# Altium PCB Стенд проверки шлейфов.PcbDoc (part 1 of 3)
Units mm, origin at the board's own origin, x right, y up, seen from the top; angles counter-clockwise.
Board outline 130 x 70 mm, 2 copper layers (Top Layer, Bottom Layer), stack 1.571 mm thick; 262 components, 230 nets, 835 pads, 564 vias.
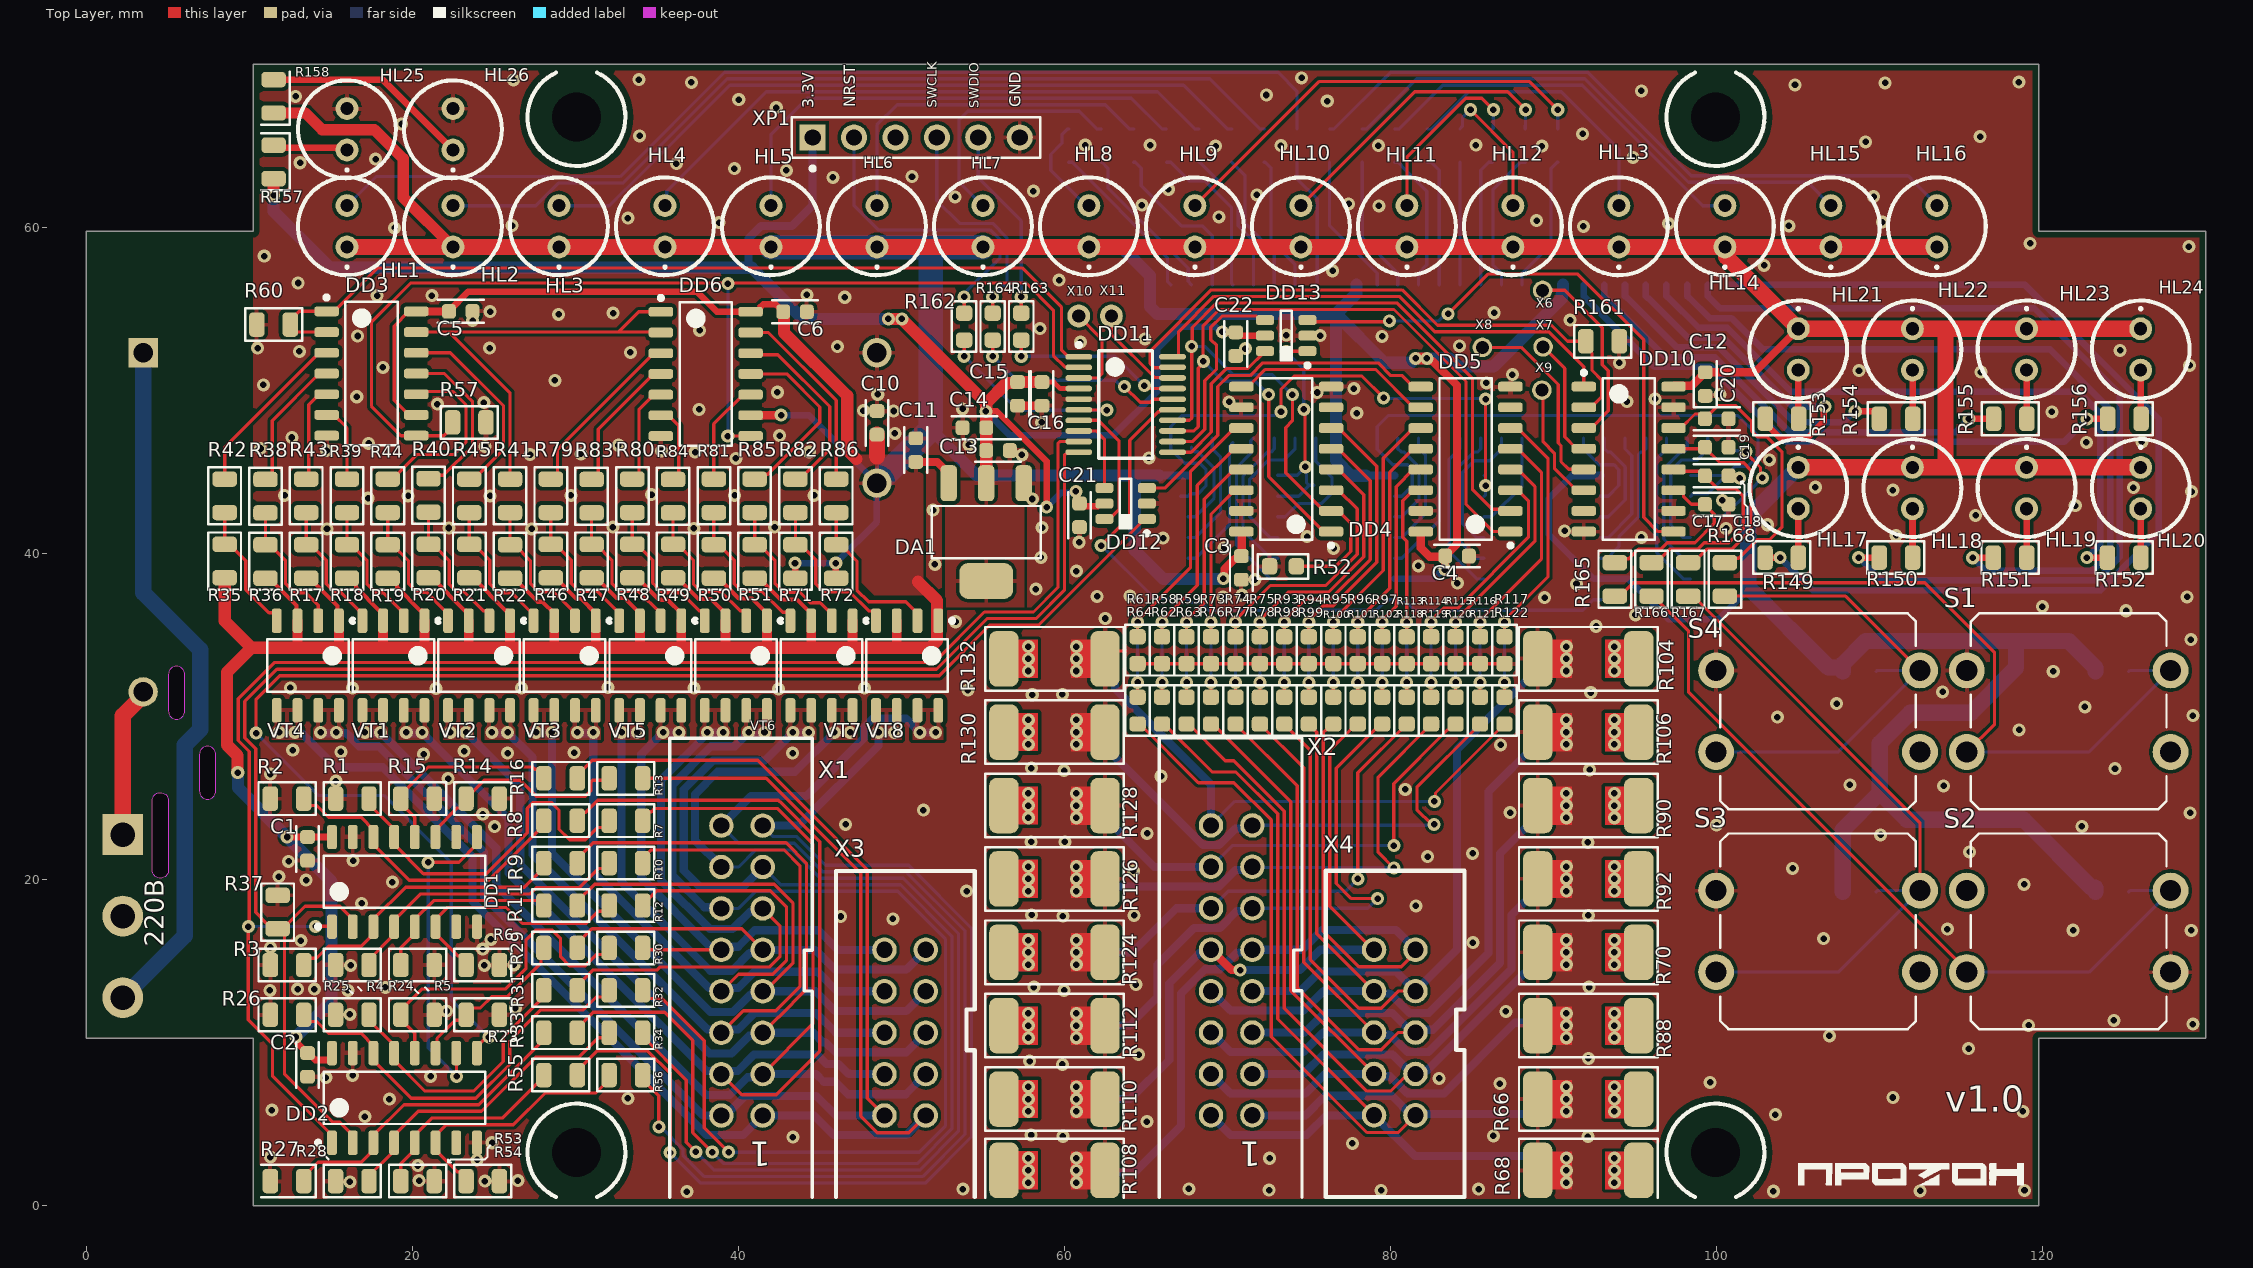
[diagram p0: Top Layer view]
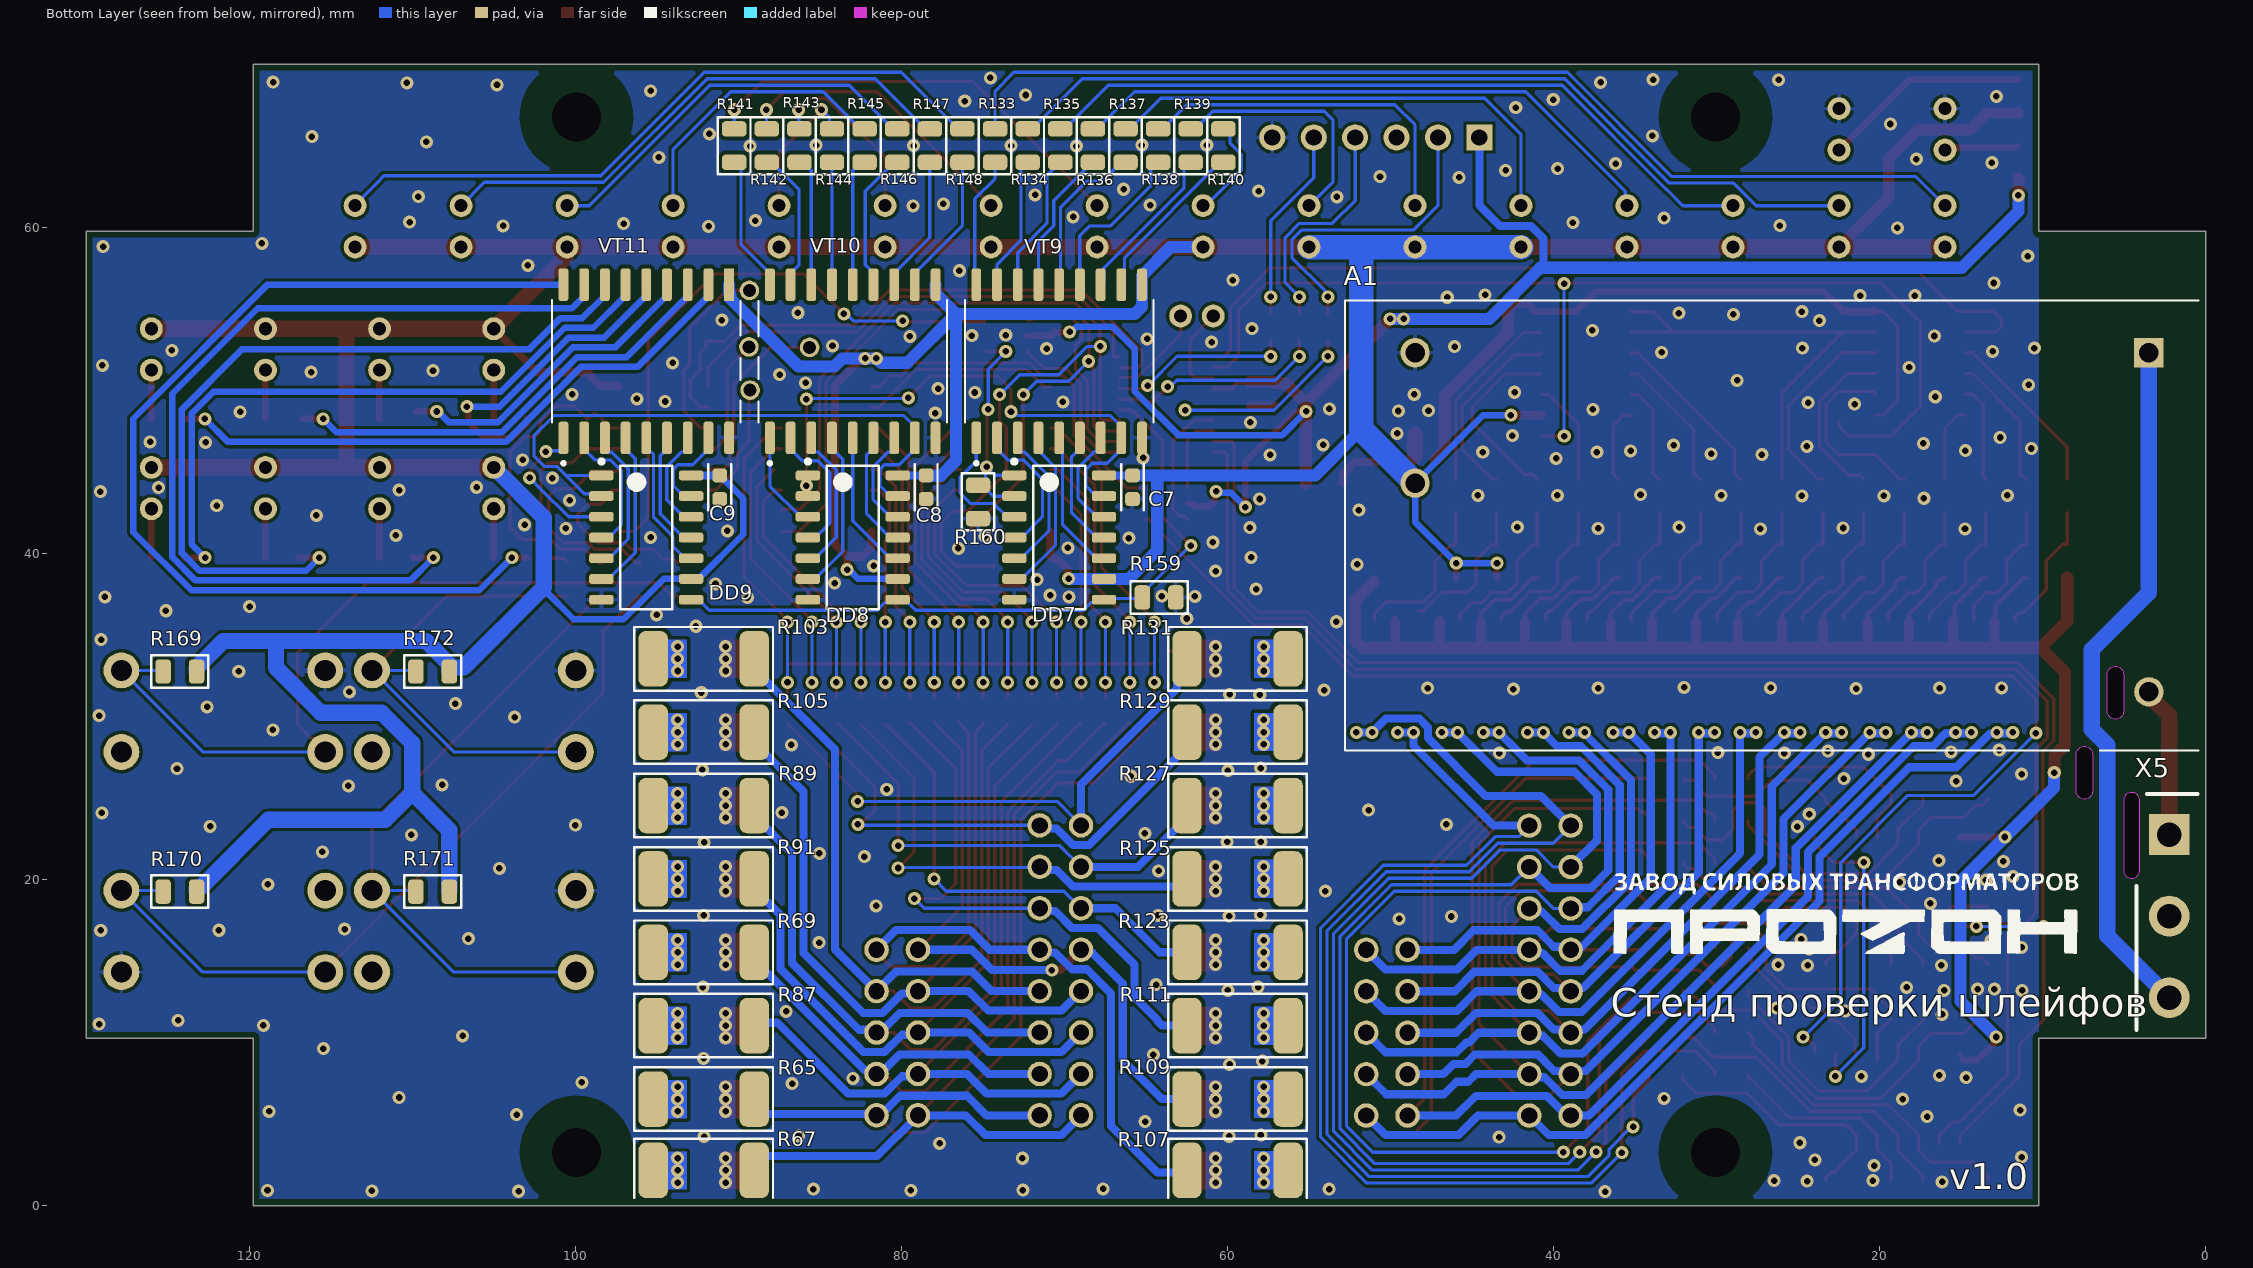
[diagram p1: Bottom Layer view, seen from below]
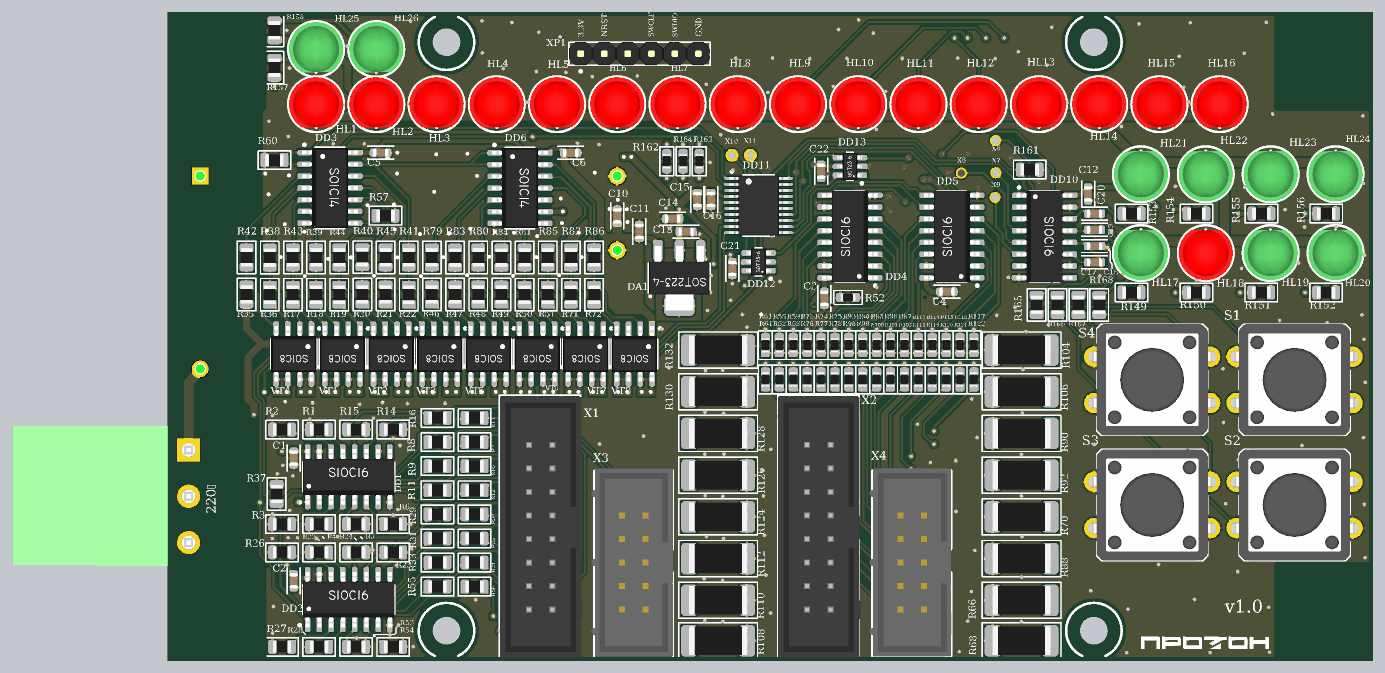
[diagram p4: 3D render of the assembled board from above, using the file's embedded part models]
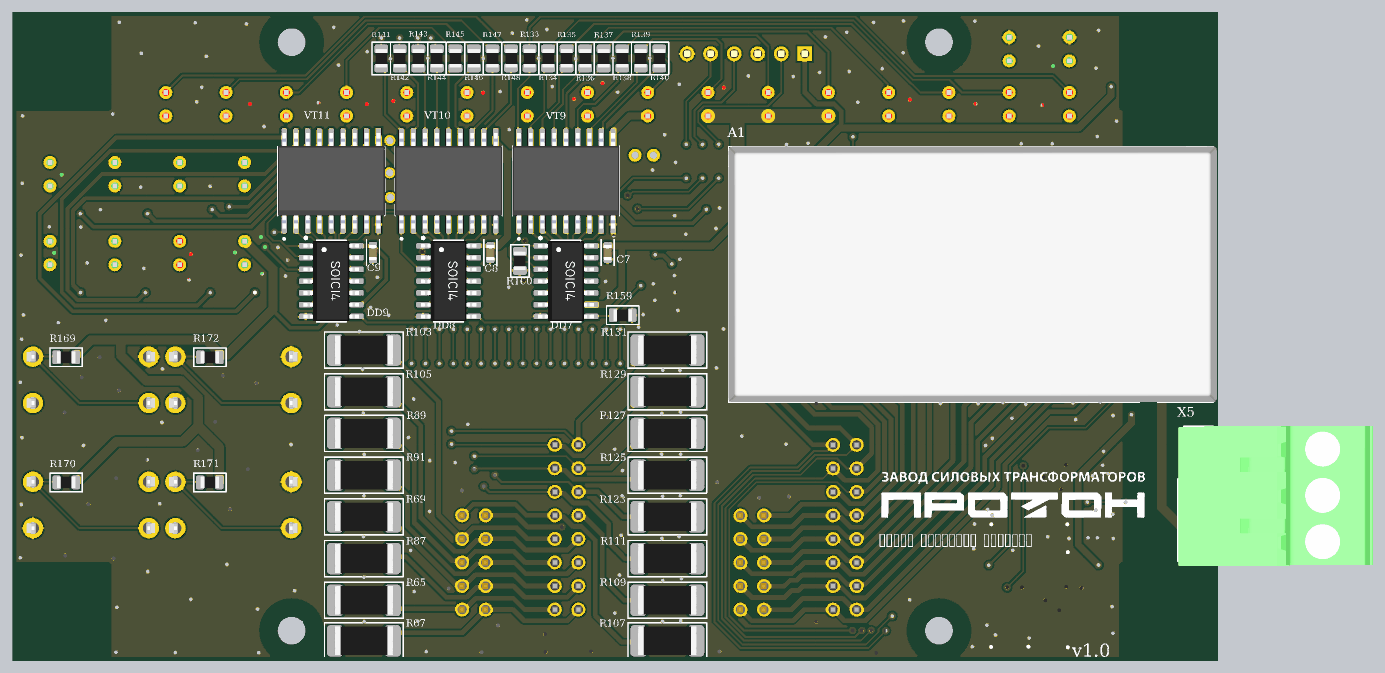
[diagram p5: 3D render of the assembled board from below, using the file's embedded part models]

## Layer stack, top to bottom
Top Solder: solder mask 0.0102, Solder Resist, Dk 3.5
Top Layer: signal copper 0.0356
Dielectric 1: dielectric 1.5, FR-4, Dk 4.8
Bottom Layer: signal copper 0.0356
Bottom Solder: solder mask 0.0102, Solder Resist, Dk 3.5

## Board outline
0,10.253 0,59.747 10.253,59.747 10.253,70 119.747,70 119.747,59.747 130,59.747 130,10.253 119.747,10.253 119.747,0 10.253,0 10.253,10.253
cut-out: 4.55,20.075 cw(c4.55,20.575) 4.05,20.575 4.05,24.825 cw(c4.55,24.825) 4.55,25.325 cw(c4.55,24.825) 5.05,24.825 5.05,20.575 cw(c4.55,20.575)
cut-out: 6.05,32.575 ccw(c5.55,32.575) 5.55,33.075 ccw(c5.55,32.575) 5.05,32.575 5.05,30.325 ccw(c5.55,30.325) 5.55,29.825 ccw(c5.55,30.325) 6.05,30.325
cut-out: 7.95,27.665 ccw(c7.45,27.665) 7.45,28.165 ccw(c7.45,27.665) 6.95,27.665 6.95,25.415 ccw(c7.45,25.415) 7.45,24.915 ccw(c7.45,25.415) 7.95,25.415

## Design rules (kind name [scope] priority, off if disabled: settings)
BoardOutlineClearance \BoardOutlineClearance [All] p1: gap=0.4 ignorepadtopadclearanceinfootprint=FALSE // Отступ элементов топологии от края печатной платы
Clearance "\Mounting holes Clearance" [IsPad and (not PadIsPlated) and (not InAnyComponent)] p1: gap=2 ignorepadtopadclearanceinfootprint=FALSE // Зазор для крепёжных отверстий платы
Clearance \UnPlatedPadClearance [IsPad and (not PadIsPlated)] p2: gap=0.25 ignorepadtopadclearanceinfootprint=FALSE // Отступ элементов топологии от неметализированного отверстия на всех полях
Clearance "\Polygon clearance" [InPolygon] p3: gap=0.2 ignorepadtopadclearanceinfootprint=FALSE // Зазор между заливкой и прочим
Clearance [IsKeepOut] p4: gap=0.001 ignorepadtopadclearanceinfootprint=FALSE
Clearance "\Clearance 4 class" [All] p5: gap=0.2 ignorepadtopadclearanceinfootprint=FALSE // Зазор 4 класс точности
Creepage "Schematic Creepage Distance_1" [InNetClass('HighVoltage2')] p1: checkdistance=2.5
Creepage "Schematic Creepage Distance" [InNetClass('HighVoltage1')] p2: checkdistance=2.5
HoleSize /UnplatedPlatedHoleSize [IsPad and (not PadIsPlated)] p1: absolutevalues=TRUE maxlimit=5 minlimit=0.025 maxpercent=80.000 minpercent=20.000 // Неметализированные контактные площадки
HoleSize /PlatedHoleSize [IsVia or (IsPad and PadIsPlated)] p2: absolutevalues=TRUE maxlimit=5 minlimit=0.3 maxpercent=80.000 minpercent=20.000 // Переходные отверстия и метализированные контактные площадки
HoleSize [All] p3: absolutevalues=TRUE maxlimit=2.54 minlimit=0.025 maxpercent=80.000 minpercent=20.000
MinimumAnnularRing \MinimumAnnularRingPad [All] p1: minimumring=0.2 // Поясок контактной площадки метализированной
MinimumAnnularRing \MinimumAnnularRingVia [IsVia] p2: minimumring=0.15 // Поясок переходного отверстия
MinimumSolderMaskSliver \MinimumSolderMaskSliver [All] p1: minsoldermaskwidth=0.15
MinimumSolderMaskSliver [All] p2: minsoldermaskwidth=0.254
PolygonConnect \PolygonConnectVia [isvia] p1: connectstyle=Direct reliefconductorwidth=0.254 reliefentries=4 polygonreliefangle="90 Angle" airgapwidth=0.254 // Подключение переходных отверстий к полигону
PolygonConnect \PolygonConnect [All] p2: connectstyle=Relief reliefconductorwidth=0.254 reliefentries=4 polygonreliefangle="90 Angle" airgapwidth=0.2
PolygonConnect [All] p3: connectstyle=Relief reliefconductorwidth=0.254 reliefentries=4 polygonreliefangle="90 Angle" airgapwidth=0.254
RoutingVias [All] p1: holewidth=0.3 width=0.8 viastyle="Through Hole" minholewidth=0.3 minwidth=0.8 maxholewidth=0.3 maxwidth=0.8
SilkToSilkClearance \SilkToSilkClearance [All] p1: silktosilkclearance=0.15
SilkToSilkClearance [All] p2: silktosilkclearance=0.254
SilkToSolderMaskClearance \SilkToSolderMaskClearance [IsPad] p1: minsilkscreentomaskgap=0.1 clearancetoexposedcopper=TRUE
SilkToSolderMaskClearance [IsPad] p2: minsilkscreentomaskgap=0.254 clearancetoexposedcopper=TRUE
SolderMaskExpansion "\SolderMaskExpansion Via" [isvia] p1: expansion=-5 istentingtop=FALSE // Закрыть переходные отверстия маской
SolderMaskExpansion \SolderMaskExpansion [All] p2: expansion=0.05 istentingtop=FALSE
SolderMaskExpansion [All] p3: expansion=0.102 istentingtop=FALSE
SupplyNets "Schematic Supply Nets_100" [InNet('6А')] p1: voltage=0.000
SupplyNets "Schematic Supply Nets_99" [InNet('DATA2_MK')] p2: voltage=0.000
SupplyNets "Schematic Supply Nets_98" [InNet('SCL_165_1')] p3: voltage=0.000
SupplyNets "Schematic Supply Nets_97" [InNet('6_OUT')] p4: voltage=0.000
SupplyNets "Schematic Supply Nets_96" [InNet('10_OUT')] p5: voltage=0.000
SupplyNets "Schematic Supply Nets_95" [InNet('8_IN')] p6: voltage=0.000
SupplyNets "Schematic Supply Nets_94" [InNet('2_OUT')] p7: voltage=0.000
SupplyNets "Schematic Supply Nets_93" [InNet('1_SIG')] p8: voltage=0.000
SupplyNets "Schematic Supply Nets_92" [InNet('3В')] p9: voltage=0.000
SupplyNets "Schematic Supply Nets_91" [InNet('15_OUT')] p10: voltage=0.000
SupplyNets "Schematic Supply Nets_90" [InNet('11_SIG')] p11: voltage=0.000
SupplyNets "Schematic Supply Nets_89" [InNet('9В')] p12: voltage=0.000
SupplyNets "Schematic Supply Nets_88" [InNet('DATA2_165')] p13: voltage=0.000
SupplyNets "Schematic Supply Nets_87" [InNet('13В')] p14: voltage=0.000
SupplyNets "Schematic Supply Nets_86" [InNet('DATA4_MK')] p15: voltage=0.000
SupplyNets "Schematic Supply Nets_85" [InNet('15А')] p16: voltage=0.000
SupplyNets "Schematic Supply Nets_84" [InNet('15_SIG')] p17: voltage=0.000
SupplyNets "Schematic Supply Nets_83" [InNet('7_SIG')] p18: voltage=0.000
SupplyNets "Schematic Supply Nets_82" [InNet('3_OUT')] p19: voltage=0.000
SupplyNets "Schematic Supply Nets_81" [InNet('GND')] p20: voltage=0.000
SupplyNets "Schematic Supply Nets_80" [InNet('13А')] p21: voltage=0.000
SupplyNets "Schematic Supply Nets_79" [InNet('11_IN')] p22: voltage=0.000
SupplyNets "Schematic Supply Nets_78" [InNet('4В')] p23: voltage=0.000
SupplyNets "Schematic Supply Nets_77" [InNet('2А')] p24: voltage=0.000
SupplyNets "Schematic Supply Nets_76" [InNet('11_OUT')] p25: voltage=0.000
SupplyNets "Schematic Supply Nets_75" [InNet('12_SIG')] p26: voltage=0.000
SupplyNets "Schematic Supply Nets_74" [InNet('3_IN')] p27: voltage=0.000
SupplyNets "Schematic Supply Nets_73" [InNet('6_IN')] p28: voltage=0.000
SupplyNets "Schematic Supply Nets_72" [InNet('14_IN')] p29: voltage=0.000
SupplyNets "Schematic Supply Nets_71" [InNet('DATA_LED')] p30: voltage=0.000
SupplyNets "Schematic Supply Nets_70" [InNet('SCL_164')] p31: voltage=0.000
SupplyNets "Schematic Supply Nets_69" [InNet('9А')] p32: voltage=0.000
SupplyNets "Schematic Supply Nets_68" [InNet('8В')] p33: voltage=0.000
SupplyNets "Schematic Supply Nets_67" [InNet('DATA_KEY')] p34: voltage=0.000
SupplyNets "Schematic Supply Nets_66" [InNet('SWDIO')] p35: voltage=0.000
SupplyNets "Schematic Supply Nets_65" [InNet('SH/L\D\_1')] p36: voltage=0.000
SupplyNets "Schematic Supply Nets_64" [InNet('2_IN')] p37: voltage=0.000
SupplyNets "Schematic Supply Nets_63" [InNet('SWCLK')] p38: voltage=0.000
SupplyNets "Schematic Supply Nets_62" [InNet('4_SIG')] p39: voltage=0.000
SupplyNets "Schematic Supply Nets_61" [InNet('10А')] p40: voltage=0.000
SupplyNets "Schematic Supply Nets_60" [InNet('15_IN')] p41: voltage=0.000
SupplyNets "Schematic Supply Nets_59" [InNet('4_IN')] p42: voltage=0.000
SupplyNets "Schematic Supply Nets_58" [InNet('1_OUT')] p43: voltage=0.000
SupplyNets "Schematic Supply Nets_57" [InNet('10В')] p44: voltage=0.000
SupplyNets "Schematic Supply Nets_56" [InNet('9_OUT')] p45: voltage=0.000
SupplyNets "Schematic Supply Nets_55" [InNet('1В')] p46: voltage=0.000
SupplyNets "Schematic Supply Nets_54" [InNet('11В')] p47: voltage=0.000
SupplyNets "Schematic Supply Nets_53" [InNet('14_OUT')] p48: voltage=0.000
SupplyNets "Schematic Supply Nets_52" [InNet('5_OUT')] p49: voltage=0.000
SupplyNets "Schematic Supply Nets_51" [InNet('13_SIG')] p50: voltage=0.000
SupplyNets "Schematic Supply Nets_50" [InNet('5А')] p51: voltage=0.000
SupplyNets "Schematic Supply Nets_49" [InNet('12_IN')] p52: voltage=0.000
SupplyNets "Schematic Supply Nets_48" [InNet('3.3V')] p53: voltage=0.000
SupplyNets "Schematic Supply Nets_47" [InNet('12В')] p54: voltage=0.000
SupplyNets "Schematic Supply Nets_46" [InNet('DATA3_MK')] p55: voltage=0.000
SupplyNets "Schematic Supply Nets_45" [InNet('5V')] p56: voltage=0.000
SupplyNets "Schematic Supply Nets_44" [InNet('1А')] p57: voltage=0.000
SupplyNets "Schematic Supply Nets_43" [InNet('SCL_165_KEY')] p58: voltage=0.000
SupplyNets "Schematic Supply Nets_42" [InNet('8А')] p59: voltage=0.000
SupplyNets "Schematic Supply Nets_41" [InNet('7В')] p60: voltage=0.000
SupplyNets "Schematic Supply Nets_40" [InNet('4А')] p61: voltage=0.000
SupplyNets "Schematic Supply Nets_39" [InNet('0_SIG')] p62: voltage=0.000
SupplyNets "Schematic Supply Nets_38" [InNet('10_IN')] p63: voltage=0.000
SupplyNets "Schematic Supply Nets_37" [InNet('DATA_164')] p64: voltage=0.000
SupplyNets "Schematic Supply Nets_36" [InNet('13_OUT')] p65: voltage=0.000
SupplyNets "Schematic Supply Nets_35" [InNet('3_SIG')] p66: voltage=0.000
SupplyNets "Schematic Supply Nets_34" [InNet('3А')] p67: voltage=0.000
SupplyNets "Schematic Supply Nets_33" [InNet('7_IN')] p68: voltage=0.000
SupplyNets "Schematic Supply Nets_32" [InNet('15В')] p69: voltage=0.000
SupplyNets "Schematic Supply Nets_31" [InNet('DATA1_165')] p70: voltage=0.000
SupplyNets "Schematic Supply Nets_30" [InNet('14А')] p71: voltage=0.000
SupplyNets "Schematic Supply Nets_29" [InNet('4_OUT')] p72: voltage=0.000
SupplyNets "Schematic Supply Nets_28" [InNet('DATA1_MK')] p73: voltage=0.000
SupplyNets "Schematic Supply Nets_27" [InNet('9_IN')] p74: voltage=0.000
SupplyNets "Schematic Supply Nets_26" [InNet('SCL_165_2')] p75: voltage=0.000
SupplyNets "Schematic Supply Nets_25" [InNet('12_OUT')] p76: voltage=0.000
SupplyNets "Schematic Supply Nets_24" [InNet('5В')] p77: voltage=0.000
SupplyNets "Schematic Supply Nets_23" [InNet('10_SIG')] p78: voltage=0.000
SupplyNets "Schematic Supply Nets_22" [InNet('8_OUT')] p79: voltage=0.000
SupplyNets "Schematic Supply Nets_21" [InNet('13_IN')] p80: voltage=0.000
SupplyNets "Schematic Supply Nets_20" [InNet('0_OUT')] p81: voltage=0.000
SupplyNets "Schematic Supply Nets_19" [InNet('8_SIG')] p82: voltage=0.000
SupplyNets "Schematic Supply Nets_18" [InNet('6_SIG')] p83: voltage=0.000
SupplyNets "Schematic Supply Nets_17" [InNet('SCL_LED')] p84: voltage=0.000
SupplyNets "Schematic Supply Nets_16" [InNet('12А')] p85: voltage=0.000
SupplyNets "Schematic Supply Nets_15" [InNet('5_SIG')] p86: voltage=0.000
SupplyNets "Schematic Supply Nets_14" [InNet('6В')] p87: voltage=0.000
SupplyNets "Schematic Supply Nets_13" [InNet('9_SIG')] p88: voltage=0.000
SupplyNets "Schematic Supply Nets_12" [InNet('7А')] p89: voltage=0.000
SupplyNets "Schematic Supply Nets_11" [InNet('NRST')] p90: voltage=0.000
SupplyNets "Schematic Supply Nets_10" [InNet('5_IN')] p91: voltage=0.000
SupplyNets "Schematic Supply Nets_9" [InNet('2_SIG')] p92: voltage=0.000
SupplyNets "Schematic Supply Nets_8" [InNet('14В')] p93: voltage=0.000
SupplyNets "Schematic Supply Nets_7" [InNet('1_IN')] p94: voltage=0.000
SupplyNets "Schematic Supply Nets_6" [InNet('2В')] p95: voltage=0.000
SupplyNets "Schematic Supply Nets_5" [InNet('SH/L\D\_KEY')] p96: voltage=0.000
SupplyNets "Schematic Supply Nets_4" [InNet('14_SIG')] p97: voltage=0.000
SupplyNets "Schematic Supply Nets_3" [InNet('11А')] p98: voltage=0.000
SupplyNets "Schematic Supply Nets_2" [InNet('0_IN')] p99: voltage=0.000
SupplyNets "Schematic Supply Nets_1" [InNet('SH/L\D\_2')] p100: voltage=0.000
SupplyNets "Schematic Supply Nets" [InNet('7_OUT')] p101: voltage=0.000
Width [All] p1: maxlimit=5 minlimit=0.2 preferedwidth=0.254
26 further rules are at their usual default settings.

## Classes and differential pairs
net class HighVoltage2: NetA1_1
net class HighVoltage1: NetA1_2 NetX5_2
component class "Схема 1": C1 C2 C3 C4 C5 C6 DD1 DD2 DD3 DD4 DD5 DD6 R1 R2 R3 R4 R5 R6 R7 R8 R9 R10 R11 R12 R13 R14 R15 R16 R17 R18 R19 R20 R21 R22 R23 R24 R25 R26 R27 R28 R29 R30 R31 R32 R33 R34 R35 R36 R37 R38 R39 R40 R41 R42 R43 R44 R45 R46 R47 R48 R49 R50 R51 R52 R53 R54 R55 R56 R57 R58 R59 R60 R61 R62 R63 R64 R65 R66 R67 R68 R69 R70 R71 R72 R73 R74 R75 R76 R77 R78 R79 R80 R81 R82 R83 R84 R85 R86 R87 R88 R89 R90 R91 R92 R93 R94 R95 R96 R97 R98 R99 R100 R101 R102 R103 R104 R105 R106 R107 R108 R109 R110 R111 R112 R113 R114 R115 R116 R117 R118 R119 R120 R121 R122 R123 R124 R125 R126 R127 R128 R129 R130 R131 R132 VT1 VT2 VT3 VT4 VT5 VT6 VT7 VT8 X1 X2 X3 X4
component class "Проц и питание": A1 C7 C8 C9 C10 C11 C12 C13 C14 C15 C16 C17 C18 C19 C20 C21 C22 DA1 DD7 DD8 DD9 DD10 DD11 DD12 DD13 HL1 HL2 HL3 HL4 HL5 HL6 HL7 HL8 HL9 HL10 HL11 HL12 HL13 HL14 HL15 HL16 HL17 HL18 HL19 HL20 HL21 HL22 HL23 HL24 HL25 HL26 R133 R134 R135 R136 R137 R138 R139 R140 R141 R142 R143 R144 R145 R146 R147 R148 R149 R150 R151 R152 R153 R154 R155 R156 R157 R158 R159 R160 R161 R162 R163 R164 R165 R166 R167 R168 R169 R170 R171 R172 S1 S2 S3 S4 VT9 VT10 VT11 X5 X6 X7 X8 X9 X10 X11 XP1 ьь

## Components (designator, comment, footprint, x,y, rotation, side; value= is the part's Value field where it differs from the comment)
A1 "IRM-15-5" IRM-15-5 26.45,41.7 r0 bottom
C1 "0,1 мк" CCAP0603 13.58,21.875 r270 top
C2 "0,1 мк" CCAP0603 13.58,8.625 r270 top
C3 "0,1 мк" CCAP0603 70.85,39.105 r270 top
C4 "0,1 мк" CCAP0603 84.075,39.83 r0 top
C5 "0,1 мк" CCAP0603 22.975,54.835 r0 top
C6 "0,1 мк" CCAP0603 43.475,54.81 r0 top
C7 "0,1 мк" CCAP0603 65.825,44.05 r270 bottom
C8 "0,1 мк" CCAP0603 78.485,44.05 r270 bottom
C9 "0,1 мк" CCAP0603 91.145,44.05 r270 bottom
C10 "10 мк" CCAP0603 48.5,48 r90 top
C11 "10 мк" CCAP0603 50.875,46.325 r90 top
C12 "0,1 мк" CCAP0603 99.3,50.375 r270 top
C13 "10 мк" CCAP0603 55.925,46.3 r0 top
C14 "10 мк" CCAP0603 54.475,47.7 r180 top
C15 "4,7 мк" CCAP0603 57.125,49.775 r90 top
C16 "0,1 мк" CCAP0603 58.625,49.775 r270 top
C17 "0,01 мк" CCAP0603 100,43 r0 top
C18 "0,01 мк" CCAP0603 100,44.75 r0 top
C19 "0,01 мк" CCAP0603 100,46.5 r0 top
C20 "0,01 мк" CCAP0603 100,48.25 r0 top
C21 "0,1 мк" CCAP0603 60.921,42.331 r270 top
C22 "0,1 мк" CCAP0603 70.5,52.825 r270 top
DA1 "AMS1117-3.3" "SOT223-4 6.5x3.5" 55.2,41.3 r270 top
DD1 "74HCT165" "SOIC16 9.9x3.9" 19.525,19.85 r90 top
DD2 "74HCT165" "SOIC16 9.9x3.9" 19.525,6.6 r90 top
DD3 "74HCT164" "SOIC14 8.6x3.9" 17.5,51.025 r0 top
DD4 "74HCT165" "SOIC16 9.9x3.9" 73.6,45.775 r180 top
DD5 "74HCT165" "SOIC16 9.9x3.9" 84.6,45.775 r180 top
DD6 "74HCT164" "SOIC14 8.6x3.9" 38,51 r0 top
DD7 "74HCT164" "SOIC14 8.6x3.9" 70.325,40.965 r180 bottom
DD8 "74HCT164" "SOIC14 8.6x3.9" 82.985,40.965 r180 bottom
DD9 "74HCT164" "SOIC14 8.6x3.9" 95.645,40.965 r180 bottom
DD10 "74HCT165" "SOIC16 9.9x3.9" 94.6,45.775 r0 top
DD11 "STM32G030F6P6" "TSSOP-20 (6.5x4.4)" 63.75,49.125 r0 top
DD12 "74LVC2G17" "SOT23-6 2.9x1.6" 63.75,43.05 r180 top
DD13 "74LVC2G17" "SOT23-6 2.9x1.6" 73.6,53.35 r180 top
HL1 "Красный" "LED RED 5MM" 16,60.05 r270 top
HL2 "Красный" "LED RED 5MM" 22.5,60.05 r270 top
HL3 "Красный" "LED RED 5MM" 29,60.05 r270 top
HL4 "Красный" "LED RED 5MM" 35.5,60.05 r270 top
HL5 "Красный" "LED RED 5MM" 42,60.05 r270 top
HL6 "Красный" "LED RED 5MM" 48.5,60.05 r270 top
HL7 "Красный" "LED RED 5MM" 55,60.05 r270 top
HL8 "Красный" "LED RED 5MM" 61.5,60.05 r270 top
HL9 "Красный" "LED RED 5MM" 68,60.05 r270 top
HL10 "Красный" "LED RED 5MM" 74.5,60.05 r270 top
HL11 "Красный" "LED RED 5MM" 81,60.05 r270 top
HL12 "Красный" "LED RED 5MM" 87.5,60.05 r270 top
HL13 "Красный" "LED RED 5MM" 94,60.05 r270 top
HL14 "Красный" "LED RED 5MM" 100.5,60.05 r270 top
HL15 "Красный" "LED RED 5MM" 107,60.05 r270 top
HL16 "Красный" "LED RED 5MM" 113.5,60.05 r270 top
HL17 "Зеленый" "LED GREEN 5MM" 105,44 r90 top
HL18 "Красный" "LED RED 5MM" 112,44 r90 top
HL19 "Зеленый" "LED GREEN 5MM" 119,44 r90 top
HL20 "Зеленый" "LED GREEN 5MM" 126,44 r90 top
HL21 "Зеленый" "LED GREEN 5MM" 105,52.5 r90 top
HL22 "Зеленый" "LED GREEN 5MM" 112,52.5 r90 top
HL23 "Зеленый" "LED GREEN 5MM" 119,52.5 r90 top
HL24 "Зеленый" "LED GREEN 5MM" 126,52.5 r90 top
HL25 "Зеленый" "LED GREEN 5MM" 16,66 r270 top
HL26 "Зеленый" "LED GREEN 5MM" 22.5,66 r270 top
R1 "100 к" RES0805 16.325,24.95 r180 top
R2 "100 к" RES0805 12.325,24.95 r180 top
R3 "100 к" RES0805 12.325,14.75 r180 top
R4 "100 к" RES0805 16.325,14.75 r180 top
R5 "100 к" RES0805 20.325,14.75 r0 top
R6 "100 к" RES0805 24.325,14.75 r0 top
R7 "1 к" RES0805 33.1,23.6 r180 top
R8 "1 к" RES0805 29.1,23.6 r180 top
R9 "1 к" RES0805 29.1,21 r180 top
R10 "1 к" RES0805 33.1,21 r180 top
R11 "1 к" RES0805 29.1,18.4 r180 top
R12 "1 к" RES0805 33.1,18.4 r180 top
R13 "1 к" RES0805 33.1,26.2 r180 top
R14 "100 к" RES0805 24.325,24.95 r0 top
R15 "100 к" RES0805 20.325,24.95 r0 top
R16 "1 к" RES0805 29.1,26.2 r180 top
R17 "10 к" RES0805 13.5,39.5 r270 top
R18 "10 к" RES0805 16,39.5 r270 top
R19 "10 к" RES0805 18.5,39.5 r270 top
R20 "10 к" RES0805 21,39.525 r270 top
R21 "10 к" RES0805 23.5,39.525 r270 top
R22 "10 к" RES0805 26,39.5 r270 top
R23 "100 к" RES0805 24.325,11.7 r0 top
R24 "100 к" RES0805 20.325,11.7 r0 top
R25 "100 к" RES0805 16.325,11.7 r180 top
R26 "100 к" RES0805 12.325,11.7 r180 top
R27 "100 к" RES0805 12.325,1.5 r180 top
R28 "100 к" RES0805 16.325,1.5 r180 top
R29 "1 к" RES0805 29.1,15.8 r180 top
R30 "1 к" RES0805 33.1,15.8 r180 top
R31 "1 к" RES0805 29.1,13.2 r180 top
R32 "1 к" RES0805 33.1,13.2 r180 top
R33 "1 к" RES0805 29.1,10.6 r180 top
R34 "1 к" RES0805 33.1,10.6 r180 top
R35 "10 к" RES0805 8.5,39.525 r270 top
R36 "10 к" RES0805 11,39.5 r270 top
R37 "10 к" RES0805 11.75,18 r270 top
R38 "220" RES0805 11,43.5 r90 top
R39 "220" RES0805 16,43.525 r90 top
R40 "220" RES0805 21,43.55 r90 top
R41 "220" RES0805 26,43.525 r90 top
R42 "220" RES0805 8.5,43.525 r90 top
R43 "220" RES0805 13.5,43.525 r90 top
R44 "220" RES0805 18.5,43.525 r90 top
R45 "220" RES0805 23.5,43.525 r90 top
R46 "10 к" RES0805 28.5,39.525 r270 top
R47 "10 к" RES0805 31,39.525 r270 top
R48 "10 к" RES0805 33.5,39.525 r270 top
R49 "10 к" RES0805 36,39.525 r270 top
R50 "10 к" RES0805 38.5,39.5 r270 top
R51 "10 к" RES0805 41,39.5 r270 top
R52 "10 к" RES0603 73.4,39.2 r0 top
R53 "100 к" RES0805 20.325,1.5 r0 top
R54 "100 к" RES0805 24.325,1.5 r0 top
R55 "1 к" RES0805 29.1,8 r180 top
R56 "1 к" RES0805 33.1,8 r180 top
R57 "10 к" RES0805 23.5,48.025 r180 top
R58 "100 к" RES0603 65.985,34.055 r270 top
R59 "100 к" RES0603 67.485,34.055 r270 top
R60 "10 к" RES0805 11.5,54.025 r0 top
R61 "100 к" RES0603 64.485,34.055 r270 top
R62 "1 к" RES0603 65.985,30.355 r90 top
R63 "1 к" RES0603 67.485,30.355 r90 top
R64 "1 к" RES0603 64.485,30.355 r90 top
R65 "5" RES2512 92.125,6.53 r0 bottom
R66 "5" RES2512 92.125,6.53 r180 top
R67 "5" RES2512 92.125,2.155 r0 bottom
R68 "5" RES2512 92.125,2.155 r180 top
R69 "5" RES2512 92.125,15.53 r0 bottom
R70 "5" RES2512 92.125,15.53 r180 top
R71 "10 к" RES0805 43.5,39.5 r270 top
R72 "10 к" RES0805 46,39.5 r270 top
R73 "100 к" RES0603 68.985,34.055 r270 top
R74 "100 к" RES0603 70.485,34.055 r270 top
R75 "100 к" RES0603 71.985,34.055 r270 top
R76 "1 к" RES0603 68.985,30.355 r90 top
R77 "1 к" RES0603 70.485,30.355 r90 top
R78 "1 к" RES0603 71.985,30.355 r90 top
R79 "220" RES0805 28.5,43.525 r90 top
R80 "220" RES0805 33.5,43.525 r90 top
R81 "220" RES0805 38.5,43.525 r90 top
R82 "220" RES0805 43.5,43.525 r90 top
R83 "220" RES0805 31,43.5 r90 top
R84 "220" RES0805 36,43.5 r90 top
R85 "220" RES0805 41,43.525 r90 top
R86 "220" RES0805 46,43.525 r90 top
R87 "5" RES2512 92.125,11.03 r0 bottom
R88 "5" RES2512 92.125,11.03 r180 top
R89 "5" RES2512 92.125,24.53 r0 bottom
R90 "5" RES2512 92.125,24.53 r180 top
R91 "5" RES2512 92.125,20.03 r0 bottom
R92 "5" RES2512 92.125,20.03 r180 top
R93 "100 к" RES0603 73.485,34.055 r270 top
R94 "100 к" RES0603 74.985,34.055 r270 top
R95 "100 к" RES0603 76.485,34.055 r270 top
R96 "100 к" RES0603 77.985,34.055 r270 top
R97 "100 к" RES0603 79.485,34.055 r270 top
R98 "1 к" RES0603 73.485,30.355 r90 top
R99 "1 к" RES0603 74.985,30.355 r90 top
R100 "1 к" RES0603 76.485,30.355 r90 top
R101 "1 к" RES0603 77.985,30.355 r90 top
R102 "1 к" RES0603 79.485,30.355 r90 top
R103 "5" RES2512 92.125,33.53 r0 bottom
R104 "5" RES2512 92.125,33.53 r180 top
R105 "5" RES2512 92.125,29.03 r0 bottom
R106 "5" RES2512 92.125,29.03 r180 top
R107 "5" RES2512 59.385,2.155 r180 bottom
R108 "5" RES2512 59.385,2.155 r0 top
R109 "5" RES2512 59.385,6.53 r180 bottom
R110 "5" RES2512 59.385,6.53 r0 top
R111 "5" RES2512 59.385,11.03 r180 bottom
R112 "5" RES2512 59.385,11.03 r0 top
R113 "100 к" RES0603 80.985,34.055 r270 top
R114 "100 к" RES0603 82.485,34.055 r270 top
R115 "100 к" RES0603 83.985,34.055 r270 top
R116 "100 к" RES0603 85.485,34.055 r270 top
R117 "100 к" RES0603 86.985,34.055 r270 top
R118 "1 к" RES0603 80.985,30.355 r90 top
R119 "1 к" RES0603 82.485,30.355 r90 top
R120 "1 к" RES0603 83.985,30.355 r90 top
R121 "1 к" RES0603 85.485,30.355 r90 top
R122 "1 к" RES0603 86.985,30.355 r90 top
R123 "5" RES2512 59.385,15.53 r180 bottom
R124 "5" RES2512 59.385,15.53 r0 top
R125 "5" RES2512 59.385,20.03 r180 bottom
R126 "5" RES2512 59.385,20.03 r0 top
R127 "5" RES2512 59.385,24.53 r180 bottom
R128 "5" RES2512 59.385,24.53 r0 top
R129 "5" RES2512 59.385,29.03 r180 bottom
R130 "5" RES2512 59.385,29.03 r0 top
R131 "5" RES2512 59.385,33.53 r180 bottom
R132 "5" RES2512 59.385,33.53 r0 top
R133 "220" RES0805 74.255,65 r90 bottom
R134 "220" RES0805 72.255,65 r90 bottom
R135 "220" RES0805 70.255,65 r90 bottom
R136 "220" RES0805 68.255,65 r90 bottom
R137 "220" RES0805 66.255,65 r90 bottom
R138 "220" RES0805 64.255,65 r90 bottom
R139 "220" RES0805 62.255,65 r90 bottom
R140 "220" RES0805 60.255,65 r90 bottom
R141 "220" RES0805 90.255,65 r90 bottom
R142 "220" RES0805 88.255,65 r90 bottom
R143 "220" RES0805 86.255,65 r90 bottom
R144 "220" RES0805 84.255,65 r90 bottom
R145 "220" RES0805 82.255,65 r90 bottom
R146 "220" RES0805 80.255,65 r90 bottom
R147 "220" RES0805 78.255,65 r90 bottom
R148 "220" RES0805 76.255,65 r90 bottom
R149 "150" RES0805 103.988,39.737 r0 top
R150 "220" RES0805 110.987,39.737 r0 top
R151 "150" RES0805 117.988,39.737 r0 top
R152 "150" RES0805 124.987,39.737 r0 top
R153 "150" RES0805 104,48.25 r0 top
R154 "150" RES0805 111,48.25 r0 top
R155 "150" RES0805 118,48.25 r0 top
R156 "150" RES0805 125,48.25 r0 top
R157 "150" RES0805 11.5,64 r90 top
R158 "330" RES0805 11.5,68.025 r90 top
R159 "10 к" RES0805 64.2,37.29 r0 bottom
R160 "10 к" RES0805 75.3,43.15 r90 bottom
R161 "10 к" RES0805 93,53 r180 top
R162 "100" RES0603 53.85,53.9 r270 top
R163 "100" RES0603 57.35,53.9 r270 top
R164 "100" RES0603 55.6,53.9 r270 top
R165 "1 к" RES0805 93.75,38.4 r90 top
R166 "1 к" RES0805 96,38.4 r90 top
R167 "1 к" RES0805 98.25,38.4 r90 top
R168 "1 к" RES0805 100.5,38.4 r90 top
R169 "10 к" RES0805 124.25,32.75 r0 bottom
R170 "10 к" RES0805 124.25,19.25 r0 bottom
R171 "10 к" RES0805 108.75,19.25 r0 bottom
R172 "10 к" RES0805 108.75,32.75 r0 bottom
S1 "FSM103" PBUT3 121.583,30.315 r180 top
S2 "FSM103" PBUT3 121.583,16.815 r0 top
S3 "FSM103" PBUT3 106.214,16.815 r180 top
S4 "FSM103" PBUT3 106.214,30.315 r180 top
VT1 "IRF7328" "SOIC8 4.9x3.9" 18.85,33.114 r270 top
VT2 "IRF7328" "SOIC8 4.9x3.9" 24.1,33.114 r270 top
VT3 "IRF7328" "SOIC8 4.9x3.9" 29.35,33.114 r270 top
VT4 "IRF7328" "SOIC8 4.9x3.9" 13.6,33.114 r270 top
VT5 "IRF7328" "SOIC8 4.9x3.9" 34.6,33.114 r270 top
VT6 "IRF7328" "SOIC8 4.9x3.9" 39.85,33.114 r270 top
VT7 "IRF7328" "SOIC8 4.9x3.9" 45.1,33.114 r270 top
VT8 "IRF7328" "SOIC8 4.9x3.9" 50.35,33.114 r270 top
VT9 "ULN2803" IC_ULN2803ADW#1 70.325,51.775 r90 bottom
VT10 "ULN2803" IC_ULN2803ADW#1 82.985,51.775 r90 bottom
VT11 "ULN2803" IC_ULN2803ADW#2 95.645,51.775 r90 bottom
X1 "IDC-16" IDC-16 41.5,14.41 r180 top value=Pad
X2 "IDC-16" IDC-16 71.525,14.42 r180 top value=Pad
X3 "IDC-10" IDC-10 50.238,10.595 r180 top
X4 "IDC-10" IDC-10 80.263,10.605 r180 top
X5 "5EHDV-03P" MSTB3 2.25,12.75 r90 bottom
X6 "" "Контакт 0,8 мм"#1 89.325,56.125 r90 top
X7 "" "Контакт 0,8 мм"#1 89.35,52.66 r90 top
X8 "" "Контакт 0,8 мм"#1 85.625,52.625 r90 top
X9 "" "Контакт 0,8 мм"#1 89.275,50 r90 top
X10 "" "Контакт 0,8 мм"#2 60.875,54.55 r0 top
X11 "" "Контакт 0,8 мм"#2 62.875,54.55 r0 top
XP1 "PLS-6" PLS-6 50.905,65.5 r0 top

## Footprints (in the part's own frame and the unit in brackets; to place one, negate y for a bottom-side part, rotate by r counter-clockwise, add the part's x,y. Pads: shape width x height; smd on the part's side, far side on the other; paste and mask are expansions set on the pad)
CCAP0603 [mm]
  rrect50% 0.85x0.9 smd: 1(-0.725,0) 2(0.725,0)
  silkscreen extent -1.4,-0.7 1.4,0.7, body extent -0.85,-0.45 0.85,0.45, height 0.9
IC_ULN2803ADW#1 [mm]
  rrect50% 2x0.6 smd paste-0.025 mask+0.07: 1(-4.7,5.08) 2(-4.7,3.81) 3(-4.7,2.54) 4(-4.7,1.27) 5(-4.7,0) 6(-4.7,-1.27) 7(-4.7,-2.54) 8(-4.7,-3.81) 9(-4.7,-5.08) 10(4.7,-5.08) 11(4.7,-3.81) 12(4.7,-2.54) 13(4.7,-1.27) 14(4.7,0) 15(4.7,1.27) 16(4.7,2.54) 17(4.7,3.81) 18(4.7,5.08)
  silkscreen extent -6.35,-5.77 3.75,5.77, body extent -5.15,-5.77 5.15,5.77, height 2.65
IC_ULN2803ADW#2 [mm]
  rrect50% 2x0.6 smd paste-0.025 mask+0.07: 1(-4.7,5.08) 2(-4.7,3.81) 3(-4.7,2.54) 4(-4.7,1.27) 5(-4.7,0) 6(-4.7,-1.27) 7(-4.7,-2.54) 8(-4.7,-3.81) 9(-4.7,-5.08) 11(4.7,-3.81) 12(4.7,-2.54) 13(4.7,-1.27) 14(4.7,0) 15(4.7,1.27) 16(4.7,2.54) 17(4.7,3.81) 18(4.7,5.08)
  rect 2x0.6 smd paste-0.025 mask+0.07: 10(4.7,-5.08)
  silkscreen extent -6.35,-5.77 3.75,5.77, body extent -5.15,-5.77 5.15,5.77, height 2.65
IDC-10 [mm]
  round 1.5 hole 1: 1(-1.262,5.075) 2(1.278,5.075) 3(-1.262,2.535) 4(1.278,2.535) 5(-1.262,-0.005) 6(1.278,-0.005) 7(-1.262,-2.545) 8(1.278,-2.545) 9(-1.262,-5.085) 10(1.278,-5.085)
  silkscreen extent -4.26,-9.93 4.24,10.07, body extent -4.3,-10.15 4.55,10.15, height 9.03
IDC-16 [mm]
  round 1.5 hole 1: 1(0,8.89) 2(2.54,8.89) 3(0,6.35) 4(2.54,6.35) 5(0,3.81) 6(2.54,3.81) 7(0,1.27) 8(2.54,1.27) 9(0,-1.27) 10(2.54,-1.27) 11(0,-3.81) 12(2.54,-3.81) 13(0,-6.35) 14(2.54,-6.35) 15(0,-8.89) 16(2.54,-8.89)
  silkscreen extent -3.04,-14.25 5.71,13.91, body extent -3.23,-14.06 5.67,14.06, height 9
IRM-15-5 [mm]
  rect 1.8x1.8 / inner round 1.8 / far side rect 1.8x1.8 hole 1.2 mask+0.102: 1(-22.95,-10.6)
  round 1.8 hole 1.2 mask+0.102: 2(-22.95,10.2) 3(22.05,-2.6) 4(22.05,-10.6)
  silkscreen extent -25.99,-13.8 26.35,13.8, body extent -26.35,-13.8 26.35,13.8, height 23.5
"LED GREEN 5MM" [mm]
  round 1.4 hole 0.8: 1(-1.27,0) 2(1.27,0)
  silkscreen extent -3,-3 3,3, body extent -2.95,-2.95 2.5,2.95, height 9.6
"LED RED 5MM" [mm]
  round 1.4 hole 0.8: 1(-1.27,0) 2(1.27,0)
  silkscreen extent -3,-3 3,3, body extent -2.95,-2.95 2.5,2.95, height 9.6
MSTB3 [mm]
  rect 2.5x2.5 hole 1.5: 1(10,0)
  round 2.5 hole 1.5: 2(5,0) 3(0,0)
  silkscreen extent -1.97,-1.72 12.5,2, body extent -2.5,-19 12.6,2, height 14.8
PBUT3 [mm] "Capacitor, Electrolytic, Radial; Body 4 x 7 mm (Dia.xH typ); Pin Spacing 1.5 mm (typ)"
  round 2.2 hole 1.3: 1(-6.25,-2.5) 2(6.25,-2.5) 3(-6.25,2.5) 4(6.25,2.5)
  silkscreen extent -6,-6 6,6, body extent -6.93,-6 6.93,6, height 8.5
PLS-6 [mm] "Connector; IDC, Low Profile Male Header, Thru-Hole; 10 Position; Vertical; Pitch 2.54 mm; Body 20.32 x 9.2 x 9.45 mm (LxWxH)"
  rect 1.6x1.6 hole 1: 1(-6.35,0)
  round 1.6 hole 1: 2(-3.81,0) 3(-1.27,0) 4(1.27,0) 5(3.81,0) 6(6.35,0)
  silkscreen extent -7.62,-2.03 7.62,1.25, body extent -7.62,-1.25 7.62,1.25, height 8.5
RES0603 [mm]
  rrect50% 0.95x1 smd: 1(-0.825,0) 2(0.825,0)
  silkscreen extent -1.55,-0.75 1.55,0.75, body extent -0.8,-0.4 0.8,0.4, height 0.45
RES0805 [mm]
  rrect50% 0.95x1.5 smd: 1(-1.025,0) 2(1.025,0)
  silkscreen extent -1.75,-1 1.75,1, body extent -1,-0.63 1,0.62, height 0.5
RES2512 [mm]
  rrect50% 1.8x3.4 smd: 1(-3.1,0) 2(3.1,0)
  silkscreen extent -4.25,-1.95 4.25,1.95, body extent -3.15,-1.55 3.15,1.55, height 0.55
"SOIC8 4.9x3.9" [mm]
  rrect50% 1.5x0.6 smd: 1(-2.75,1.905) 2(-2.75,0.635) 3(-2.75,-0.635) 4(-2.75,-1.905) 5(2.75,-1.905) 6(2.75,-0.635) 7(2.75,0.635) 8(2.75,1.905)
  silkscreen extent -2.87,-2.5 1.6,2.82, body extent -3,-2.45 3,2.45, height 1.63
"SOIC14 8.6x3.9" [mm]
  rrect50% 1.5x0.6 smd: 1(-2.75,3.81) 2(-2.75,2.54) 3(-2.75,1.27) 4(-2.75,0) 5(-2.75,-1.27) 6(-2.75,-2.54) 7(-2.75,-3.81) 8(2.75,-3.81) 9(2.75,-2.54) 10(2.75,-1.27) 11(2.75,0) 12(2.75,1.27) 13(2.75,2.54) 14(2.75,3.81)
  silkscreen extent -2.87,-4.4 1.6,4.78, body extent -3,-4.33 3,4.32, height 1.63
"SOIC16 9.9x3.9" [mm]
  rrect50% 1.5x0.6 smd: 1(-2.75,4.445) 2(-2.75,3.175) 3(-2.75,1.905) 4(-2.75,0.635) 5(-2.75,-0.635) 6(-2.75,-1.905) 7(-2.75,-3.175) 8(-2.75,-4.445) 9(2.75,-4.445) 10(2.75,-3.175) 11(2.75,-1.905) 12(2.75,-0.635) 13(2.75,0.635) 14(2.75,1.905) 15(2.75,3.175) 16(2.75,4.445)
  silkscreen extent -2.87,-4.95 1.6,5.42, body extent -3,-4.95 3,4.95, height 1.5
"SOT23-6 2.9x1.6" [mm]
  rrect50% 1.1x0.6 smd: 1(-1.3,0.95) 2(-1.3,0) 3(-1.3,-0.95) 4(1.3,-0.95) 5(1.3,0) 6(1.3,0.95)
  silkscreen extent -1.43,-1.53 0.38,1.95, body extent -1.4,-1.46 1.4,1.46, height 1.1
"SOT223-4 6.5x3.5" [mm]
  rrect50% 2.2x1 smd: 1(-3,2.3) 2(-3,0) 3(-3,-2.3)
  rrect50% 2.2x3.3 smd: 4(3,0)
  silkscreen extent -1.6,-3.35 1.6,3.35, body extent -3.48,-3.25 3.48,3.25, height 1.7
"TSSOP-20 (6.5x4.4)" [mm]
  oval 1.65x0.35 smd: 1(-2.875,2.925) 2(-2.875,2.275) 3(-2.875,1.625) 4(-2.875,0.975) 5(-2.875,0.325) 6(-2.875,-0.325) 7(-2.875,-0.975) 8(-2.875,-1.625) 9(-2.875,-2.275) 10(-2.875,-2.925) 11(2.875,-2.925) 12(2.875,-2.275) 13(2.875,-1.625) 14(2.875,-0.975) 15(2.875,-0.325) 16(2.875,0.325) 17(2.875,0.975) 18(2.875,1.625) 19(2.875,2.275) 20(2.875,2.925)
  silkscreen extent -3,-3.3 1.65,3.77, body extent -3.2,-3.25 3.2,3.25, height 1.2
"Контакт 0,8 мм"#1 [mm]
  round 1.2 hole 0.8: 1(0,0)
"Контакт 0,8 мм"#2 [mm]
  round 1.4 hole 0.8: 1(0,0)

## Part data
A1: library part MFM-05, "IRM-15-5 (AC/DC преобразователь)"
C1 C2 C3 C4 C5 C6 C7 C8 C9 C12 C16 C21 C22: library part Конденсатор, "C0603 0,1 мкФ 50В X7R"
C10 C11 C13 C14: library part Конденсатор, "C0603 10 мкФ 25В X5R"
C15: library part Конденсатор, "C0603 4,7 мкФ 25В X5R"
C17 C18 C19 C20: library part Конденсатор, "C0603 0,01 мкФ 25В X7R"
DA1: library part L7805CD
DD1 DD2 DD4 DD5 DD10: library part 74HC165, "74HCT165D (SOIC-16)"
DD3 DD6 DD7 DD8 DD9: library part 74HC164, "74HCT164D (SOIC-14)"
DD11: Case=TSSOP-20, Manufacturer=STMicroelectronics(ST), HelpURL=https://lcsc.com/product-detail/ST-Microelectronics_STMicroelectronics-STM32G030F6P6TR_C529330.html, Price=58
DD12 DD13: "SN74LVC2G17DBVR"
HL1 HL2 HL3 HL4 HL5 HL6 HL7 HL8 HL9 HL10 HL11 HL12 HL13 HL14 HL15 HL16 HL18: library part Светодиод, "GNL-5013ED-E"
HL17 HL19 HL20 HL21 HL22 HL23 HL24 HL25 HL26: library part Светодиод, "GNL-5013GD"
R1 R2 R3 R4 R5 R6 R14 R15 R23 R24 R25 R26 R27 R28 R53 R54: library part Резистор, "R0805 100 кОм ±5%"
R7 R8 R9 R10 R11 R12 R13 R16 R29 R30 R31 R32 R33 R34 R55 R56 R165 R166 R167 R168: library part Резистор, "R0805 1 кОм ±5%"
R17 R18 R19 R20 R21 R22 R35 R36 R37 R46 R47 R48 R49 R50 R51 R57 R60 R71 R72 R159 R160 R161 R169 R170 R171 R172: library part Резистор, "R0805 10 кОм ±5%"
R38 R39 R40 R41 R42 R43 R44 R45 R79 R80 R81 R82 R83 R84 R85 R86 R133 R134 R135 R136 R137 R138 R139 R140 R141 R142 R143 R144 R145 R146 R147 R148 R150: library part Резистор, "R0805 220 Ом ±5%"
R52: library part Резистор, "R0603 10 кОм ±5%"
R58 R59 R61 R73 R74 R75 R93 R94 R95 R96 R97 R113 R114 R115 R116 R117: library part Резистор, "R0603 100 кОм ±5%"
R62 R63 R64 R76 R77 R78 R98 R99 R100 R101 R102 R118 R119 R120 R121 R122: library part Резистор, "R0603 1 кОм ±5%"
R65 R66 R67 R68 R69 R70 R87 R88 R89 R90 R91 R92 R103 R104 R105 R106 R107 R108 R109 R110 R111 R112 R123 R124 R125 R126 R127 R128 R129 R130 R131 R132: library part Резистор, "R2512 5 Ом ±5%"
R149 R151 R152 R153 R154 R155 R156 R157: library part Резистор, "R0805 150 Ом ±5%"
R158: library part Резистор, "R0805 330 Ом ±5%"
R162 R163 R164: library part Резистор, "R0603 100 Ом ±5%"
S1 S2 S3 S4: library part "Кнопка 1"
VT1 VT2 VT3 VT4 VT5 VT6 VT7 VT8: library part IRF7342, "IRF7328 (SOP-8)"
VT9 VT10 VT11: "ULN2803 (SOP-18W)"
X1 X2: library part 16_Pin
X5: library part "3 pins (Right)", "5EHDV-03P + 5ESDV-03P"
X6 X7 X8 X9 X10 X11: library part "1 pin"
XP1: library part "6 pins (Left)"

## Free pads (board coordinates)
  round 0 hole 3 unplated: 0(30.075,3.25) 0(30.075,66.75) 0(99.925,3.25) 0(99.925,66.75)

## Via types
v1: diameter 0.8, hole 0.4, Top Layer to Bottom Layer, tented both sides, 564 vias

## Nets (pads, with @x,y where several pads share a name; then routed paths per layer and width w, separated by ;. In a path a pad name is that pad's centre, name@x,y a point inside that pad or via, vN(x,y) a via of type N, cw(c..) or ccw(c..) an arc to the next point about the centre after c; other vN are vias at no path point)
0_IN: R64.1 R65.1 X2.1 X4.1 | length 54.9
  Top Layer w0.2: R64.1@64.485,29.53 R64.1@64.51,29.53 ; R64.1@64.51,29.63 68.215,25.925 70.395,25.925 72.675,23.645 72.675,10.355 78.55,4.48 80.475,4.48 X4.1@81.525,5.53
  Bottom Layer w0.5: X2.1@71.525,5.53 74.78,5.53 75.98,6.73 80.08,6.73 81.28,5.53 X4.1@81.525,5.53 81.616,5.621 88.39,5.621 89.025,6.256 R65.1@89.025,6.713
0_OUT: R13.1 VT4.5 VT4.6 X1.1 X3.1 | length 88.5
  Top Layer w0.2: R13.1@34.125,26.2 41.7,26.2 47.51,20.39 47.51,5.485 48.525,4.47 50.45,4.47 X3.1@51.5,5.52
  Bottom Layer w0.5: v1@11.845,28.964 v1@12.815,28.964 ; v1(12.815,29.014) 12.872,28.957 13.24,28.957 15.322,26.875 18.2,26.875 23.7,21.375 23.7,18.66 38.04,4.32 40.3,4.32 X1.1@41.5,5.52 44.63,5.52 45.83,4.32 50.3,4.32 X3.1@51.5,5.52
  other v1: 11.845,29.014
0_SIG: R35.1 R42.1 VT4.4 | length 8.3
  Top Layer w0.2: R42.1@8.5,42.5 R35.1@8.5,40.55 8.775,40.55 9.785,39.54 9.785,37.774 11.212,36.347 11.499,36.347 11.695,36.151 VT4.4@11.695,35.864
1_IN: R62.1 R67.1 X2.2 X4.2 | length 53.1
  Top Layer w0.2: R62.1@65.985,29.53 R62.1@66.01,29.53 ; R62.1@66.01,29.63 69.053,26.588 70.513,26.588 73.075,24.025 73.075,11.44 X4.2@78.985,5.53
  Bottom Layer w0.5: X2.2@68.985,5.53 70.185,4.33 74.855,4.33 76.055,5.53 X4.2@78.985,5.53 81.485,3.03 R67.1@88.39,3.03 ; R67.1@88.39,3.155 89.025,2.52 R67.1@89.025,2.155
1_OUT: R16.1 VT4.7 VT4.8 X1.2 X3.2 | length 83.6
  Top Layer w0.2: R16.1@30.125,26.2 30.125,26.401 30.574,26.85 30.584,26.85 31.034,27.3 41.2,27.3 47.91,20.59 47.91,6.57 X3.2@48.96,5.52
  Bottom Layer w0.5: v1@14.385,28.964 v1@15.355,28.964 ; v1(15.355,29.014) 15.384,28.985 15.952,28.985 16.245,28.692 16.245,28.662 16.743,28.164 17.925,28.164 24.4,21.689 24.4,18.95 37.83,5.52 X1.2@38.96,5.52 39.21,5.52 40.41,6.72 44.78,6.72 45.98,5.52 X3.2@48.96,5.52
  other v1: 14.385,29.014
1_SIG: R36.1 R38.1 VT4.2 | length 8.5
  Top Layer w0.2: R38.1@11,42.475 R36.1@11,40.525 11.275,40.525 12.225,39.575 12.225,38.15 12.8,37.575 13.475,37.575 14.235,36.815 VT4.2@14.235,35.864
1А: DD1.12 R15.1 R16.2 | length 12.8
  Top Layer w0.2: DD1.12@20.16,22.6 20.16,23.815 19.3,24.675 19.3,25.2 21,26.9 27.375,26.9 27.52,26.755 27.71,26.755 28.075,26.391 R16.2@28.075,26.2
1В: DD4.12 R58.1 R62.2 | length 18.2
  Top Layer w0.2: R62.2@65.985,31.18 v1@65.985,32.03 ; R58.1@65.985,34.88 v1@65.985,35.73 ; v1@65.985,35.88 68.15,38.045 68.15,44.16 70.4,46.41 DD4.12@70.85,46.41
  Bottom Layer w0.2: v1@65.985,32.18 v1@65.985,35.88
  other v1: 65.985,32.08 65.985,35.78
2_IN: R63.1 R69.1 X2.3 X4.3 | length 52.9
  Top Layer w0.2: R63.1@67.485,29.53 R63.1@67.51,29.53 ; R63.1@67.547,29.593 69.865,27.275 70.391,27.275 73.475,24.191 73.475,12.095 78.55,7.02 79.995,7.02 80.796,7.821 81.276,7.821 X4.3@81.525,8.07
  Bottom Layer w0.5: X2.3@71.525,8.07 74.67,8.07 75.87,9.27 80.115,9.27 81.315,8.07 81.506,8.261 82.211,8.261 88.213,14.263 88.267,14.263 89.025,15.021 R69.1@89.025,15.713
2_OUT: R7.1 VT1.5 VT1.6 X1.3 X3.3 | length 73.7
  Top Layer w0.2: R7.1@34.125,23.6 34.125,23.791 34.49,24.155 34.68,24.155 34.875,24.35 42.4,24.35 44.575,22.175 44.575,11.135 X1.3@41.5,8.06
  Bottom Layer w0.5: v1@17.095,28.964 v1@18.065,28.964 ; v1(18.065,29.014) 25.15,21.929 25.15,19.65 38.025,6.775 39.475,6.775 40.569,7.869 41.309,7.869 X1.3@41.5,8.06 44.765,8.06 45.235,7.59 45.964,7.59 46.729,6.825 50.265,6.825 X3.3@51.5,8.06
  other v1: 17.095,29.014
2_SIG: R17.1 R43.1 VT1.4 | length 8.4
  Top Layer w0.2: R43.1@13.5,42.5 R17.1@13.5,40.525 13.775,40.525 14.725,39.575 14.725,38.125 15.275,37.575 15.655,37.575 16.716,36.514 16.718,36.514 16.945,36.287 VT1.4@16.945,35.864
2А: DD1.13 R1.1 R7.2 | length 22.2
  Top Layer w0.2: R1.1@17.35,24.95 17.35,24.617 18.89,23.077 DD1.13@18.89,22.6 18.89,22.15 20.69,20.35 24.534,20.35 27.05,22.866 27.05,24.35 27.4,24.7 28.556,24.7 29.003,24.253 29.003,23.072 29.65,22.425 30.625,22.425 31.387,23.187 31.71,23.187 32.075,23.552 R7.2@32.075,23.6
2В: DD4.13 R59.1 R63.2 | length 16.3
  Top Layer w0.2: R63.2@67.485,31.18 v1@67.485,32.03 ; R59.1@67.485,34.88 v1@67.485,35.73 ; v1@67.485,35.88 68.575,36.97 68.575,43.315 70.4,45.14 DD4.13@70.85,45.14
  Bottom Layer w0.2: v1@67.485,32.18 v1@67.485,35.88
  other v1: 67.485,32.08 67.485,35.78